# Altium PCB PCB1_Esta_SI.PcbDoc (part 1 of 2)
Units mil, origin at the board's own origin, x right, y up, seen from the top; angles counter-clockwise.
Board outline 3825 x 4015 mil, 4 copper layers (Top Layer, GND, POWER_SIGNAL, Bottom Layer), stack 23.756 mil thick; 87 components, 73 nets, 564 pads, 160 vias.
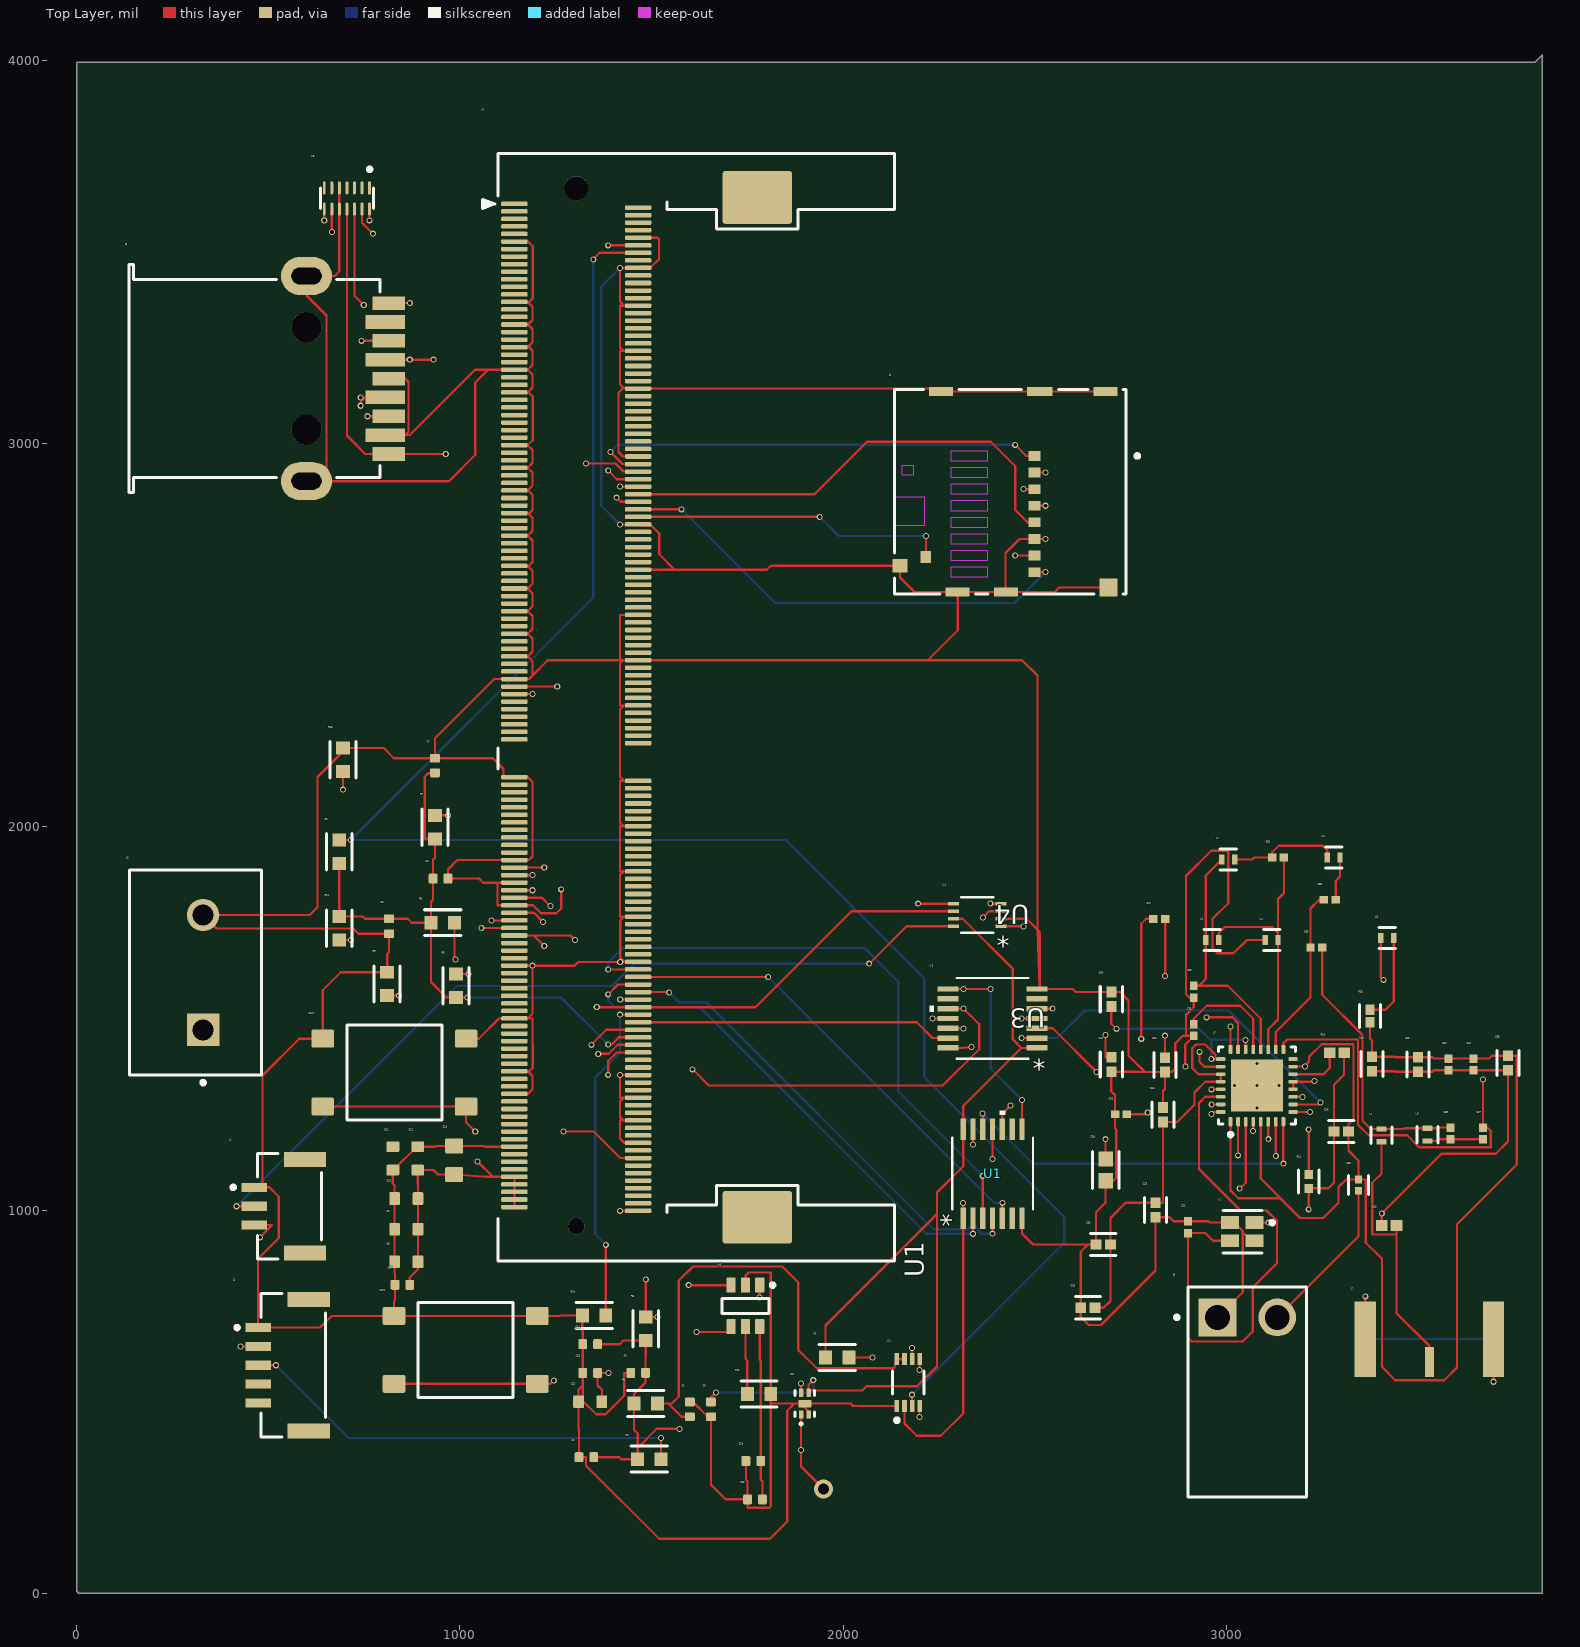
[diagram p0: Top Layer view]
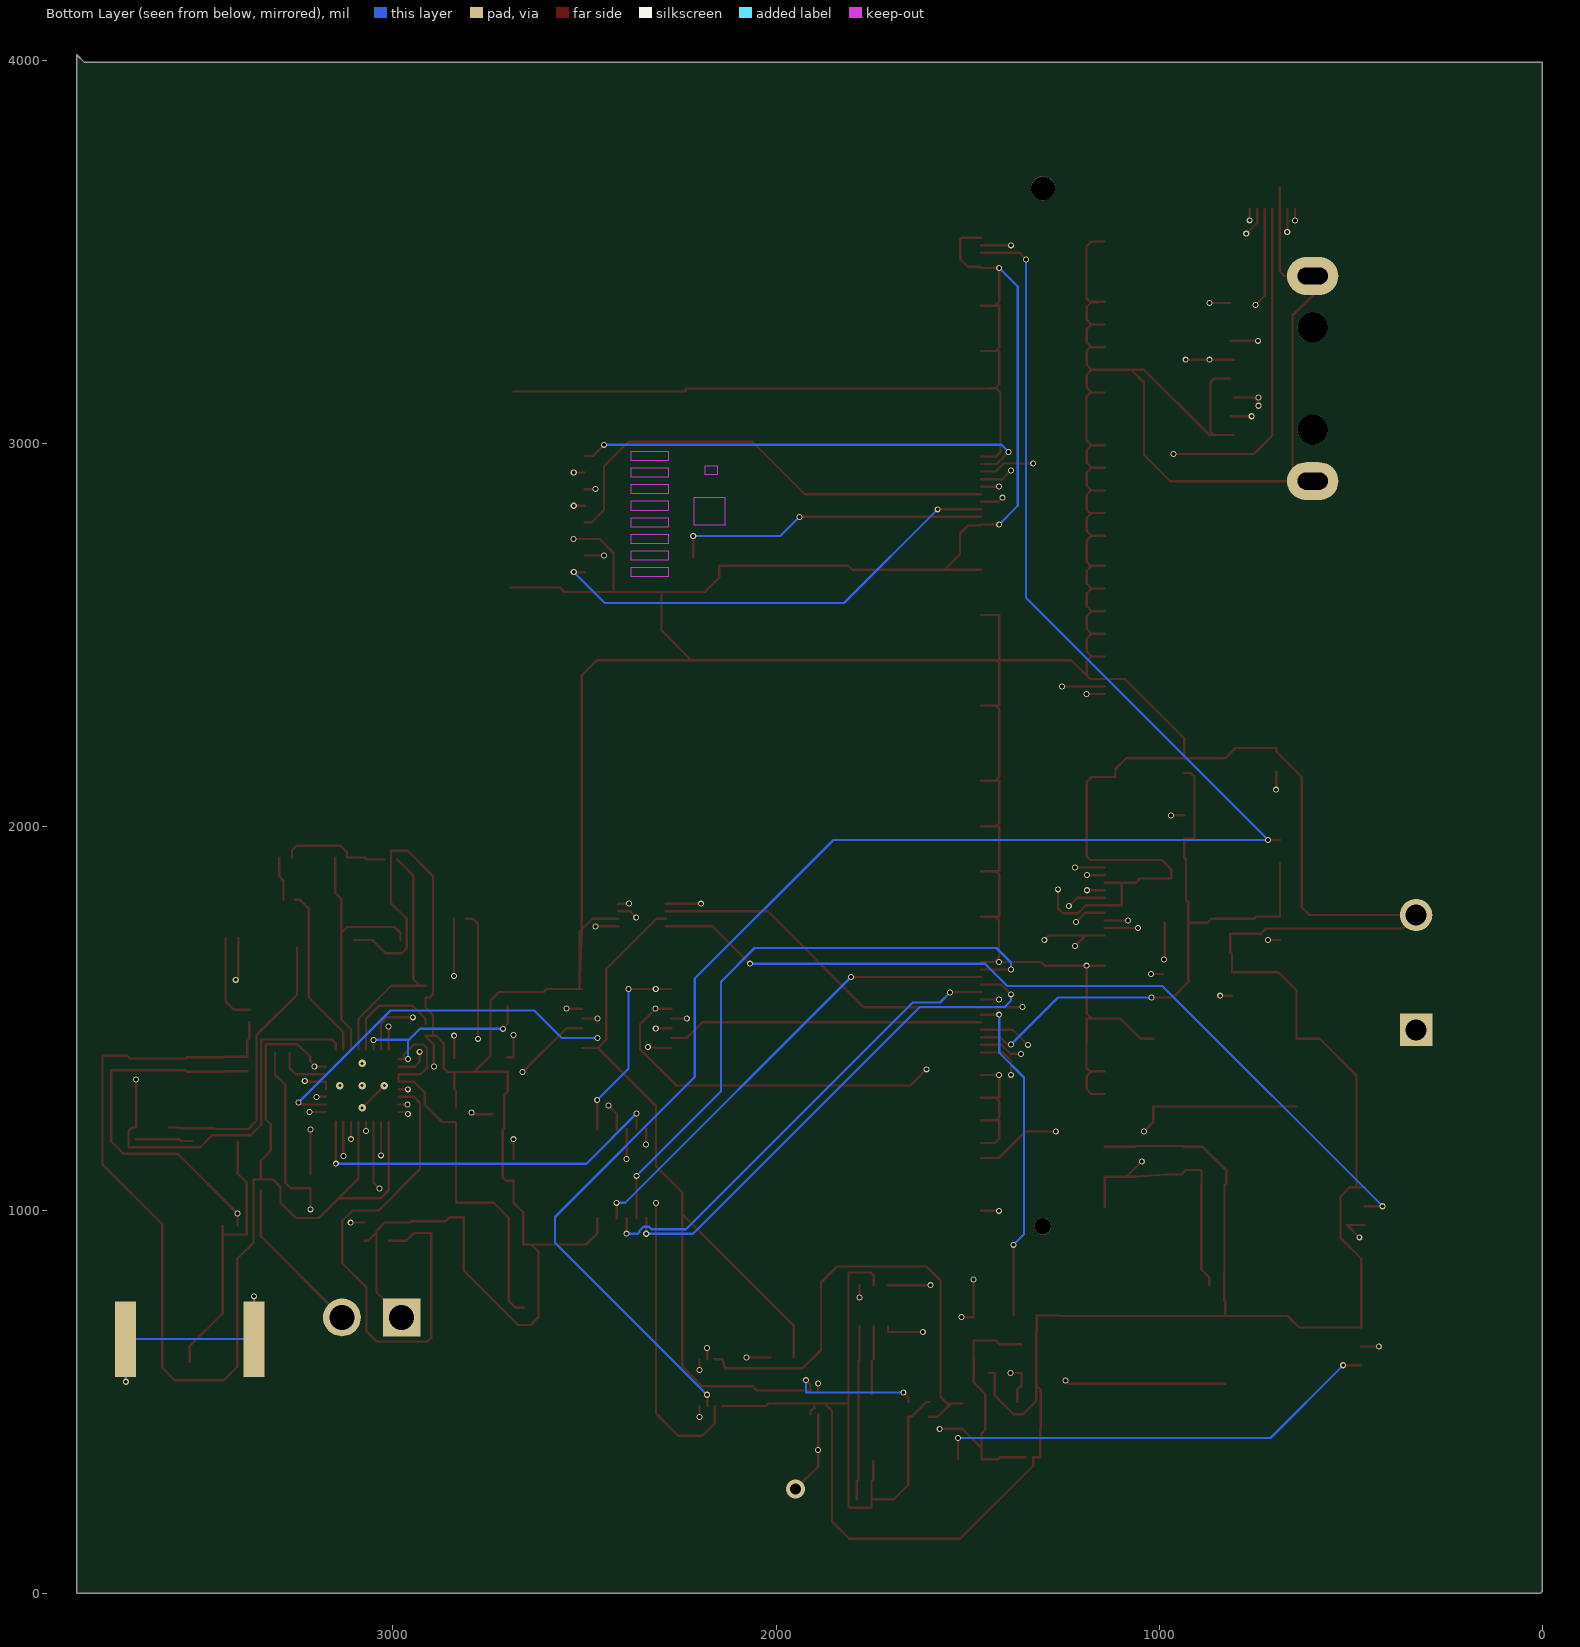
[diagram p1: Bottom Layer view, seen from below]
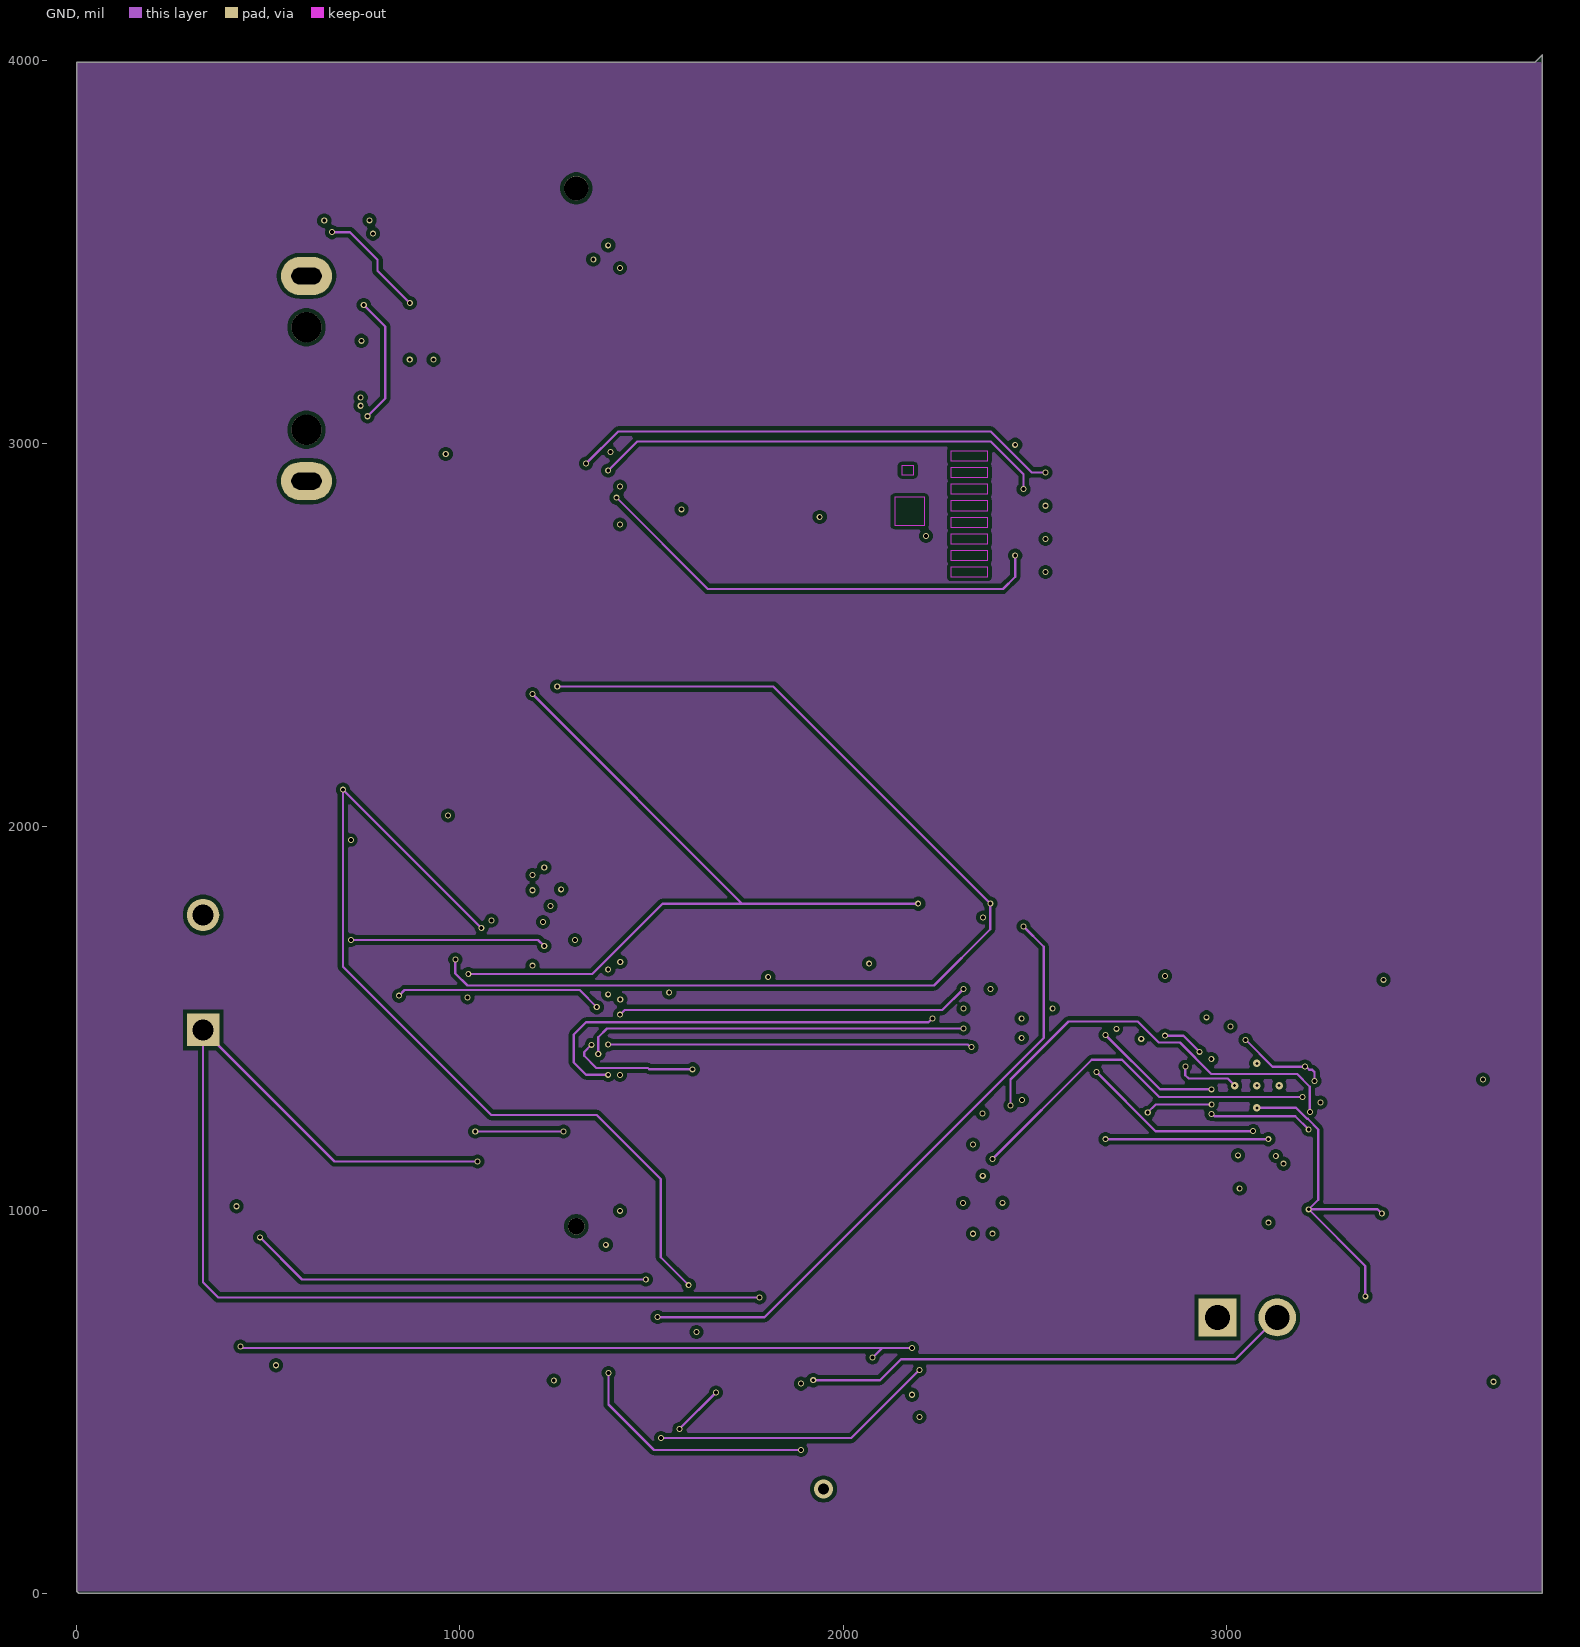
[diagram p2: GND]
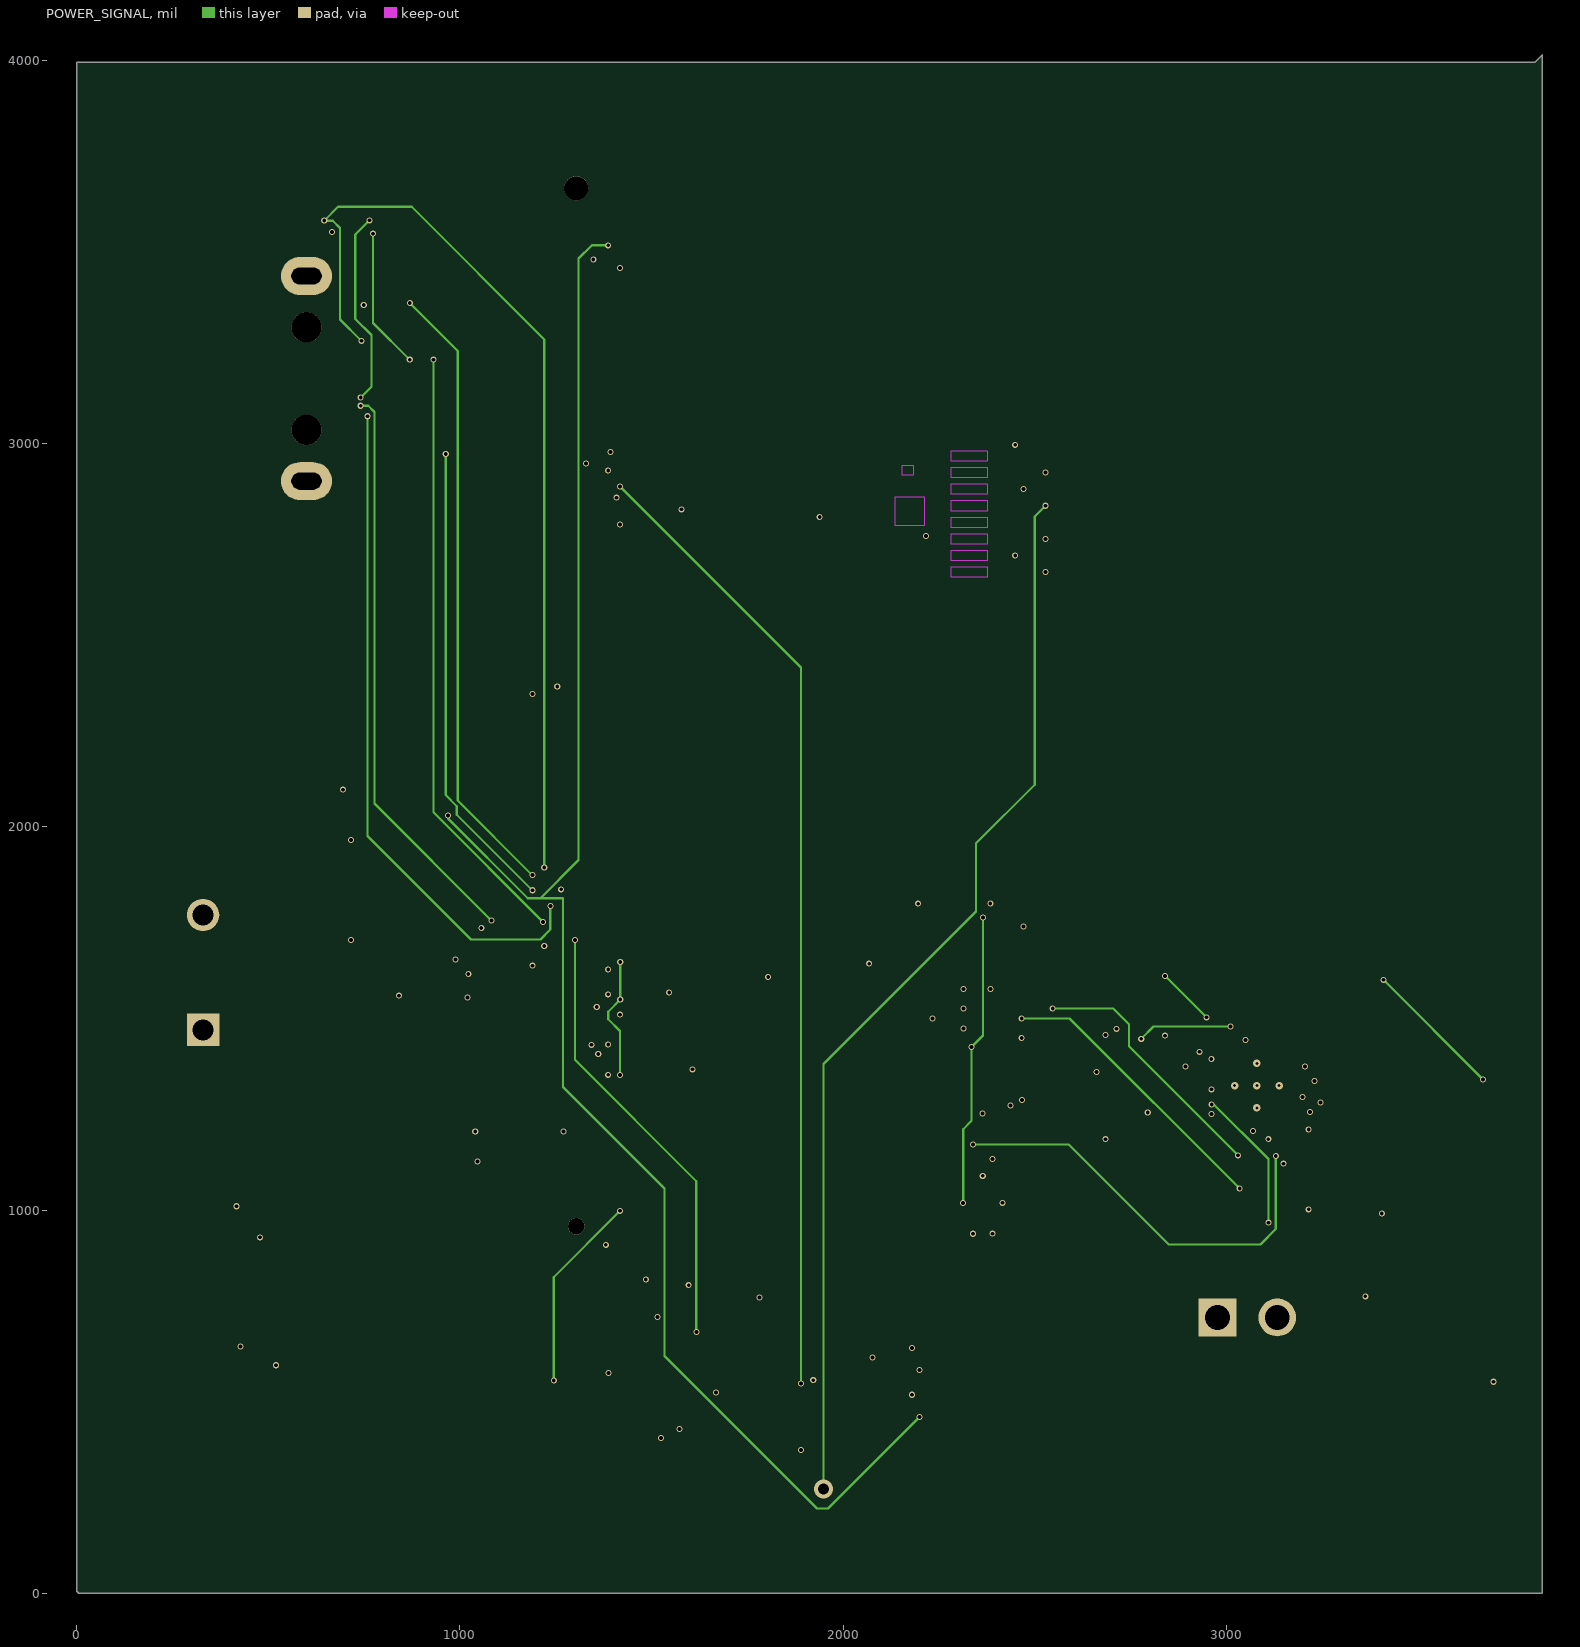
[diagram p3: POWER_SIGNAL]
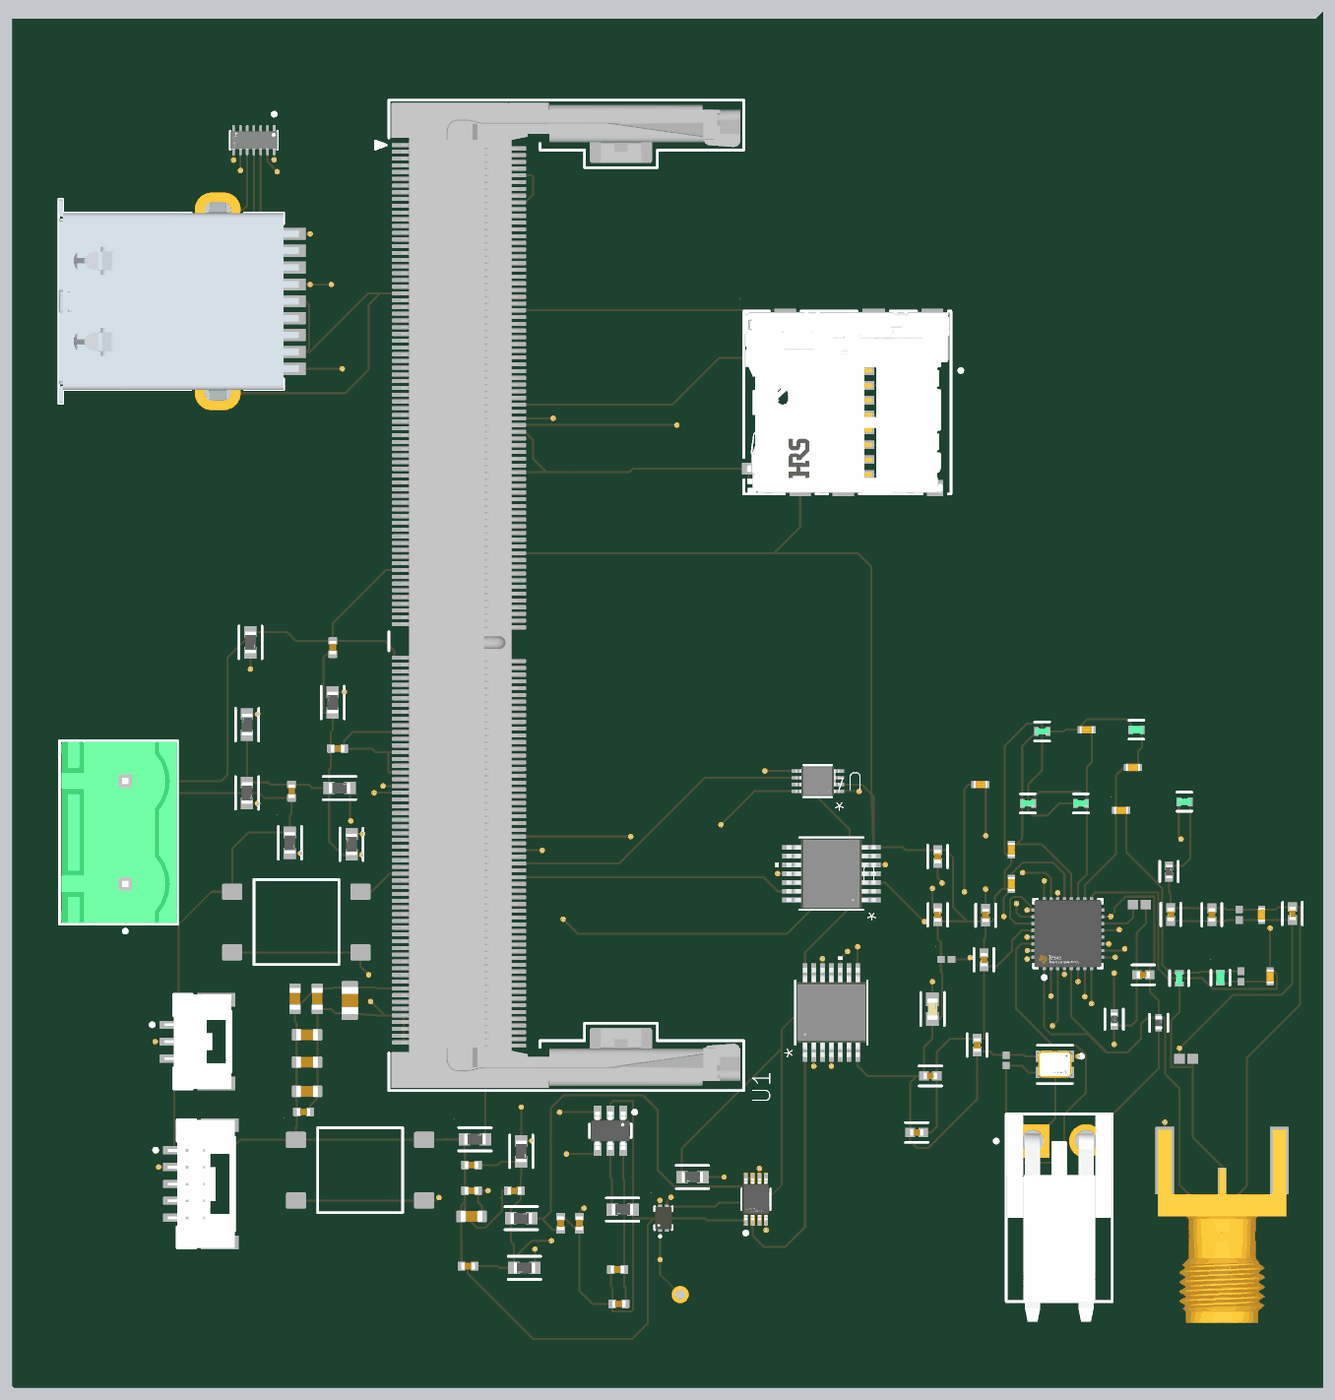
[diagram p5: 3D render of the assembled board from above, using the file's embedded part models]

## Layer stack, top to bottom
Top Solder: solder mask 0.4, Solder Resist, Dk 3.5
Top Layer: signal copper 1.4
Dielectric 2: prepreg 2.8, PP-006, Dk 4.1
GND: signal copper 1.378
Dielectric 1: dielectric 12.6, FR-4, Dk 4.8
POWER_SIGNAL: signal copper 1.378
Dielectric 3: prepreg 2.8, PP-006, Dk 4.1
Bottom Layer: signal copper 1.4
Bottom Solder: solder mask 0.4, Solder Resist, Dk 3.5

## Board outline
3805,3995 3825,4015 3825,0 5,0 0,5 0,3995

## Design rules (kind name [scope] priority, off if disabled: settings)
AssemblyTestPointUsage [All] p1: isadvanced=TRUE
AssemblyTestpoint [All] p1: isadvanced=TRUE testpointundercomponent=TRUE minsize=40 maxsize=100 preferedsize=60 minholesize=0 maxholesize=40 preferedholesize=32 testpointgrid=1 usegrid=TRUE gridtolerance=0.01 allowsidetop=TRUE allowsidebottom=TRUE
Clearance Clearance_1 [(ExistsOnLayer('GND') Or ExistsOnLayer('POWER_SIGNAL')) vs (ExistsOnLayer('GND') Or ExistsOnLayer('POWER_SIGNAL'))] p1: gap=10 ignorepadtopadclearanceinfootprint=FALSE except(5.91: Arc-Arc Arc-Track Arc-SMDPad Arc-Via Arc-Text Track-Track Track-SMDPad Track-Via Track-Text SMDPad-SMDPad SMDPad-Text Via-Via Via-Text Fill-Fill Fill-Poly Fill-Region Poly-Poly Poly-Region Region-Region Text-Text) sourcerule=46 cellrowname=All cellrowtype=0 cellcolname=All cellcoltype=0 innerlayers=TRUE
Clearance Clearance_2 [(ExistsOnLayer('Top Layer') Or ExistsOnLayer('Bottom Layer')) vs (ExistsOnLayer('Top Layer') Or ExistsOnLayer('Bottom Layer'))] p2: gap=10 ignorepadtopadclearanceinfootprint=FALSE except(5.91: Arc-Arc Arc-Track Arc-SMDPad Arc-Via Arc-Text Track-Track Track-SMDPad Track-Via Track-Text SMDPad-SMDPad SMDPad-Text Via-Via Via-Text Fill-Fill Fill-Poly Fill-Region Poly-Poly Poly-Region Region-Region Text-Text) sourcerule=46 cellrowname=All cellrowtype=0 cellcolname=All cellcoltype=0 outerlayers=TRUE
Clearance [All] p3: gap=10 ignorepadtopadclearanceinfootprint=FALSE ismatrix=TRUE
ComponentClearance [All] p1: isadvanced=TRUE gap=10 collisioncheckmode=3 verticalgap=10 showdistances=FALSE
FabricationTestPointUsage [All] p1: isadvanced=TRUE valid=0 allowmultiple=FALSE
FabricationTestpoint [All] p1: isadvanced=TRUE side=3 testpointundercomponent=TRUE minsize=40 maxsize=100 preferedsize=60 minholesize=0 maxholesize=40 preferedholesize=32 testpointgrid=1 allowsidetop=TRUE allowsidebottom=TRUE usegrid=TRUE gridtolerance=0.01
FanoutControl Fanout_BGA [IsBGA] p1: isadvanced=TRUE bgadir=Out bgaviamode=Centered fanoutstyle=Auto fanoutdirection=Alternating viagrid=1 // Fanout_BGA (Default Rule)
FanoutControl Fanout_LCC [IsLCC] p2: isadvanced=TRUE bgadir=Out bgaviamode=Centered fanoutstyle=Auto fanoutdirection=Alternating viagrid=1 // Fanout_LCC (Default Rule)
FanoutControl Fanout_SOIC [IsSOIC] p3: isadvanced=TRUE bgadir=Out bgaviamode=Centered fanoutstyle=Auto fanoutdirection=Alternating viagrid=1 // Fanout_SOIC (Default Rule)
FanoutControl Fanout_Small [(CompPinCount < 5)] p4: isadvanced=TRUE bgadir=Out bgaviamode=Centered fanoutstyle=Auto fanoutdirection=OutThenIn viagrid=1 // Fanout_Small (Default Rule)
FanoutControl Fanout_Default [All] p5: isadvanced=TRUE bgadir=Out bgaviamode=Centered fanoutstyle=Auto fanoutdirection=Alternating viagrid=1 // Fanout_Default (Default Rule)
Height [All] p1: isadvanced=TRUE minheight=0 maxheight=1000 prefheight=500
HoleSize [All] p1: isadvanced=TRUE absolutevalues=TRUE maxlimit=100 minlimit=5 maxpercent=80.000 minpercent=20.000
HoleToHoleClearance [All] p1: isadvanced=TRUE gap=10 allowstackedmicrovias=TRUE
LayerPairs [All] p1: isadvanced=TRUE enforce=TRUE
MinimumSolderMaskSliver [All] p1: isadvanced=TRUE minsoldermaskwidth=3
NetAntennae [All] p1 off: isadvanced=TRUE netantennaetolerance=0
PasteMaskExpansion [All] p1: isadvanced=TRUE expansion=0
PlaneClearance [All] p1: isadvanced=TRUE clearance=20
PlaneConnect [All] p1: isadvanced=TRUE planeconnectstyle=Relief reliefexpansion=20 reliefentries=4 reliefconductorwidth=10 reliefairgap=10
PolygonConnect [All] p1: connectstyle=Relief reliefconductorwidth=10 reliefentries=4 polygonreliefangle="90 Angle" airgapwidth=10
RoutingCorners [All] p1: isadvanced=TRUE cornerstyle=45-Degree minsetback=9.84 maxsetback=100
RoutingLayers RoutingLayers_3 [InNet('GND')] p1 off: isadvanced=TRUE top layer_v5=FALSE mid layer 1_v5=FALSE mid layer 2_v5=FALSE bottom layer_v5=FALSE
RoutingLayers RoutingLayers_2 [InNetClass('PowerNets')] p2 off: isadvanced=TRUE top layer_v5=TRUE mid layer 1_v5=FALSE mid layer 2_v5=TRUE bottom layer_v5=TRUE
RoutingLayers RoutingLayers_1 [All] p3 off: isadvanced=TRUE top layer_v5=TRUE mid layer 1_v5=FALSE mid layer 2_v5=FALSE bottom layer_v5=TRUE
RoutingLayers [All] p4: top layer_v5=TRUE mid layer 1_v5=TRUE mid layer 2_v5=TRUE bottom layer_v5=TRUE
RoutingPriority [All] p1: isadvanced=TRUE routingpriority=0
RoutingVias RoutingViaStyle_3 [All] p1: isadvanced=TRUE holewidth=10 width=15.75 viastyle="Through Hole" minholewidth=10 minwidth=15.75 maxholewidth=10 maxwidth=15.75
RoutingVias RoutingViaStyle_1 [InNet('+1V8_SOM')] p2 off: holewidth=11.81 width=23.62 viastyle="Through Hole" minholewidth=11.81 minwidth=23.62 maxholewidth=11.81 maxwidth=23.62
RoutingVias RoutingViaStyle_2 [InNetClass('Source')] p3 off: holewidth=11.81 width=23.62 viastyle="Through Hole" minholewidth=11.81 minwidth=23.62 maxholewidth=11.81 maxwidth=23.62
RoutingVias [All] p4: holewidth=28 width=50 viastyle="Through Hole" minholewidth=28 minwidth=50 maxholewidth=28 maxwidth=50
ShortCircuit [All] p1: isadvanced=TRUE allowed=FALSE
SilkToSilkClearance [All] p1 off: isadvanced=TRUE silktosilkclearance=5
SilkToSolderMaskClearance [IsPad] p1 off: isadvanced=TRUE minsilkscreentomaskgap=10 clearancetoexposedcopper=TRUE
SolderMaskExpansion [All] p1: isadvanced=TRUE expansion=0 istentingtop=FALSE
SupplyNets "Schematic Supply Nets_2" [InNet('GND')] p1: isadvanced=TRUE voltage=0.000
SupplyNets "Schematic Supply Nets_1" [InNet('VDD_REG')] p2: isadvanced=TRUE voltage=0.000
SupplyNets "Schematic Supply Nets" [InNet('3V3')] p3: isadvanced=TRUE voltage=0.000
UnRoutedNet [All] p1: isadvanced=TRUE
UnpouredPolygon [All] p1: isadvanced=TRUE
Width MaxMinWidth_1 [InNetClass('Source')] p1: maxlimit=19.68 minlimit=7.87 preferedwidth=11.81 minimp=50.000000 maximp=50.000000 favimp=50.000000
Width [All] p2: maxlimit=5.91 minlimit=5.91 preferedwidth=5.91 minimp=50.000000 maximp=50.000000 favimp=50.000000
3 further rules are at their usual default settings.

## Classes and differential pairs
net class PowerNets: 3V3 +1V8_SOM +3V3_SD +5V_CAM_USB +5V_SOM VDD_REG

## Components (designator, comment, footprint, x,y, rotation, side; value= is the part's Value field where it differs from the comment)
C1 "100pF" CAPC1005X60N 1600,480 r270 top
C2 "100nF" CAPC1005X60N 1330,355 r0 top
C3 "100nF" CAPC1005X60N 815,1740.71 r90 top
C4 "100nF" CAPC1005X60N 949.29,1865 r180 top
C5 "100nF" CAPC1005X60N 1465,575 r0 top
C6 "100nF" CAPC1005X60N 1655,480 r90 top
C7 "100nF" CAPC1005X60N 935,2160 r270 top
C8 "4.7uF" T_CAPC0603X33N 860,865 r0 top
C9 "4.7uF" T_CAPC0603X33N 860,950 r0 top
C10 "4.7uF" T_CAPC0603X33N 860,1030 r0 top
C11 "4.7uF" T_CAPC0603X33N 825,1135 r90 top
C12 "4.7uF" T_CAPC0603X33N 890,1135 r270 top
C13 "22uF" T_CAPC0805X125N 985,1130 r270 top
C14 "100nF" CAPC1005X60N 1340,650 r0 top
C15 "10uF" T_CAPC0603X33N 1340,500 r0 top
C16 "100nF" CAPC1005X60N 1340,575 r0 top
C17 "100nF" CAPC1005X60N 850,805 r0 top
C18 "150uF" CAPC1005X60N 1770,245 r0 top
C19 "100nF" CAPC1005X60N 1765.71,345 r0 top
C20 "15 pF" CAPC1005X55X25LL05T10 2725,1250 r180 top
C21 "15 pF" CAPC1005X55X25LL05T10 2900,955.35 r90 top
C22 "47nF" FP-GRM155-0_05-IPC_A 2700,1380 r90 top
C23 "47nF" FP-GRM155-0_05-IPC_A 2815,1000 r90 top
C24 "47nF" FP-GRM155-0_05-IPC_A 2835,1248.84 r270 top
C25 "47nF" FP-GRM155-0_05-IPC_A 2840,1378.84 r90 top
C26 "47nF" FP-GRM155-0_05-IPC_A 3300,1205 r0 top
C27 "1.8nF" CAPC1005X55X25LL05T10 2825,1760 r180 top
C28 "5.1 pF" CAPC1005X55X25LL05T10 2915,1570 r90 top
C29 "47nF" FP-GRM155-0_05-IPC_A 2638.84,745 r0 top
C30 "47nF" FP-GRM155-0_05-IPC_A 2700,1550 r90 top
C31 "10 nF" CAPC1005X55X25LL05T10 2915,1470 r270 top
C32 "47nF" FP-GRM155-0_05-IPC_A 2678.84,910 r0 top
C33 "5.1 pF" CAPC1005X55X25LL05T10 3135,1920 r0 top
C34 "0.22 μF" FP-C0603C-CF-IPC_B 2685,1105 r270 top
C35 "5.1 pF" CAPC1005X55X25LL05T10 3270,1810 r180 top
C36 "5.1 pF" CAPC1005X55X25LL05T10 3235,1685 r0 top
C37 "39 pF" CAPC1005X55X25LL05T10 3670,1200 r270 top
C38 "47nF" FP-GRM155-0_05-IPC_A 3735,1383.84 r270 top
C39 "2.2 pF" CAPC1005X55X25LL05T10 3585,1200 r90 top
C40 "6.2 pF" CAPC1005X60X25ML10T15 3425,960 r0 top
C41 "10 nF" CAPC1005X55X25LL05T10 3645,1380 r90 top
C42 "100 pF" CAPC1005X55X25LL05T10 3580,1380 r270 top
C43 "47nF" FP-GRM155-0_05-IPC_A 3500,1380 r270 top
C44 "47nF" FP-GRM155-0_05-IPC_A 3380,1381.16 r270 top
FB1 "L_BEAD_102_0402" FP-BLM15-0_05-IPC_C 3345,1065.1 r90 top
IC1 "MIC94073YMT" T_TDFN0P120X160X60-4N 1900,495 r0 top
J1 "" FP-BM05B-GHS-TBT_LF_SN-MFG 565,595 r90 top
J2 "BM03B-GHS-TBT (LF)(SN)(N)" FP-BM03B-GHS-TBT_LF_SN-MFG 555,1010 r90 top
J3 "1766563" FP-1766563-MFG 310,1620 r90 top
J4 "DM3NW-SF-PEJ(800)" FP-DM3NW-SF-PEJ_800-MFG 2350,2840 r90 top
J5 "692122030100" 692122030100 463.74,3170 r270 top
J6 "S2P-VH(LF)(SN)" FP-S2P-VH_LF_SN-MFG 3055,525 r0 top
J7 "Coaxial" 60312202114512 3530,345 r0 top
L1 "27 nH" FP-LQW15AN_00-W0_5-0_1-MFG 3005,1915 r0 top
L2 "56 nH" FP-LQW15AN_00-W0_5-0_1-MFG 2963.27,1705 r0 top
L3 "15nH" FP-LQW15AN_00-W0_6-0_1-MFG 3280,1920 r0 top
L4 "27 nH" FP-LQW15AN_00-W0_5-0_1-MFG 3118.27,1705 r0 top
L5 "56 nH" FP-LQW15AN_00-W0_5-0_1-MFG 3420,1710 r180 top
L6 "15nH" FP-LQW15AN_00-W0_6-0_1-MFG 3525,1196.73 r90 top
L7 "43 nF" FP-LQW15AN_00-W0_5-0_1-MFG 3405,1195 r270 top
R1 "RC0603FR-074K7L" FP-RC0603-0_55-IPC_B 1984.42,615 r180 top
R2 "RC0603FR-074K7L" FP-RC0603-0_55-IPC_B 1494.42,350 r180 top
R3 "RC0603FR-074K7L" FP-RC0603-0_55-IPC_B 685,1935 r90 top
R4 "RC0603FR-07200KL" FP-RC0603-0_55-IPC_B 1485,495 r0 top
R5 "RC0603FR-0747KL" FP-RC0603-0_55-IPC_B 955,1750 r0 top
R6 "RC0603FR-0710KL" FP-RC0603-0_55-IPC_B 990,1585.58 r90 top
R7 "RC0603FR-074K7L" FP-RC0603-0_55-IPC_B 935,1999.42 r90 top
R8 "RC0603FR-0710KL" FP-RC0603-0_55-IPC_B 1485,690 r270 top
R9 "RC0603FR-0710KL" FP-RC0603-0_55-IPC_B 810,1590 r270 top
R10 "RC0603FR-0710KL" FP-RC0603-0_55-IPC_B 1350,725 r0 top
R11 "RC0603FR-0710kL" FP-RC0603-0_55-IPC_B 685,1735.58 r270 top
R12 "RC0603FR-0710KL" FP-RC0603-0_55-IPC_B 1780.58,520 r180 top
R13 "RC0603FR-0710kL" FP-RC0603-0_55-IPC_B 695,2175 r270 top
R14 "0mR" FP-RK73Z1E-IPC_B 3215,1075 r90 top
R15 "18R" FP-RMCF0402-IPC_B 3375,1506.36 r90 top
R16 "56 Kohm" RESC1005X40X25ML10T10 3288.7,1410 r180 top
SW1 "TD-03XB" T_WMF_TD-03XB 829.02,1358.71 r0 top
SW2 "TD-03XB" T_WMF_TD-03XB 1015,635 r0 top
U1 "TXU0304PWR" TSSOP14_PW_TEX 2390,1095 r90 top
U2 "PCA9306DCUR" FP-DCU0008A-MFG 2170,550 r90 top
U3 "TXU0304PWR" TSSOP14_PW_TEX 2390,1500 r180 top
U4 "TXU0202DCUR" SO8_DCU_TEX 2350,1770 r180 top
U5 "TPD6E05U06RVZR" FP-RVZ0014A-IPC_A 705,3640 r270 top
U6 "" DBV0006A_N 1745,750 r270 top
U7 "" FP-RHB0032E-MFG 3080,1325 r90 top
X1 "2309409-2" CON-TE-2309409-2 1459.09,2312.01 r90 top
Y1 "Crystal_32Mhz" FP-ABM10W-MFG 3041.99,943.62 r180 top

## Footprints (in the part's own frame and the unit in brackets; to place one, negate y for a bottom-side part, rotate by r counter-clockwise, add the part's x,y. Pads: shape width x height; smd on the part's side, far side on the other; paste and mask are expansions set on the pad)
692122030100 [mm] "USB 3.0 Type A Horizontal SMD"
  rect 0.9x2.6 smd: 1(-3.75,8.67) 2(-1.25,8.67) 3(1.25,8.67) 4(3.75,8.67)
  rect 0.9x2.15 smd: 5(5,8.895) 6(2.5,8.895) 7(0,8.895) 8(-2.5,8.895) 9(-5,8.895)
  round 2 hole 2 unplated: MH1(-3.4,3.45) MH2(3.4,3.45)
  oval 2.52x3.4 hole 1.12 slot 2 at 90 deg: Shell(-6.8,3.45) Shell(6.8,3.45)
  silkscreen extent -7.55,-8.33 7.55,8.33, body extent -7.55,-8.33 7.55,9.47, height 7.95
60312202114512 [mm] "SMA PCB End Launch Jack Flat  Tab for 1.1mm PCB"
  rect 0.61x1.97 smd: 1(0,6.57)
  rect 1.4x5 smd: 2(-4.25,8.085) 3(4.25,8.085)
  rect 1.4x5 smd far side: 4(-4.25,8.085) 5(4.25,8.085)
  body extent -4.76,-3.95 4.76,10.34, height 4.11
CAPC1005X55X25LL05T10 [mm] "Chip Capacitor, 2-Leads, Body 1.00x0.50mm, IPC High Density"
  rect 0.56x0.52 smd: 1(-0.39,0) 2(0.39,0)
  body extent -0.53,-0.28 0.53,0.28, height 0.55
CAPC1005X60N [mm]
  rrect30% 0.58x0.66 smd: 1(-0.49,0) 2(0.49,0)
  body extent -0.5,-0.25 0.5,0.25, height 0.6
CAPC1005X60X25ML10T15 [mm] "Chip Capacitor, 2-Leads, Body 1.00x0.50mm, IPC Low Density"
  rect 0.78x0.74 smd: 1(-0.49,0) 2(0.49,0)
  body extent -0.55,-0.3 0.55,0.3, height 0.6
CON-TE-2309409-2 [mm]
  rrect50% 0.3x1.75 smd: 1(33.375,8.05) 2(33.125,-0.15) 3(32.875,8.05) 4(32.625,-0.15) 5(32.375,8.05) 6(32.125,-0.15) 7(31.875,8.05) 8(31.625,-0.15) 9(31.375,8.05) 10(31.125,-0.15) 11(30.875,8.05) 12(30.625,-0.15) 13(30.375,8.05) 14(30.125,-0.15) 15(29.875,8.05) 16(29.625,-0.15) 17(29.375,8.05) 18(29.125,-0.15) 19(28.875,8.05) 20(28.625,-0.15) 21(28.375,8.05) 22(28.125,-0.15) 23(27.875,8.05) 24(27.625,-0.15) 25(27.375,8.05) 26(27.125,-0.15) 27(26.875,8.05) 28(26.625,-0.15) 29(26.375,8.05) 30(26.125,-0.15) 31(25.875,8.05) 32(25.625,-0.15) 33(25.375,8.05) 34(25.125,-0.15) 35(24.875,8.05) 36(24.625,-0.15) 37(24.375,8.05) 38(24.125,-0.15) 39(23.875,8.05) 40(23.625,-0.15) 41(23.375,8.05) 42(23.125,-0.15) 43(22.875,8.05) 44(22.625,-0.15) 45(22.375,8.05) 46(22.125,-0.15) 47(21.875,8.05) 48(21.625,-0.15) 49(21.375,8.05) 50(21.125,-0.15) 51(20.875,8.05) 52(20.625,-0.15) 53(20.375,8.05) 54(20.125,-0.15) 55(19.875,8.05) 56(19.625,-0.15) 57(19.375,8.05) 58(19.125,-0.15) 59(18.875,8.05) 60(18.625,-0.15) 61(18.375,8.05) 62(18.125,-0.15) 63(17.875,8.05) 64(17.625,-0.15) 65(17.375,8.05) 66(17.125,-0.15) 67(16.875,8.05) 68(16.625,-0.15) 69(16.375,8.05) 70(16.125,-0.15) 71(15.875,8.05) 72(15.625,-0.15) 73(15.375,8.05) 74(15.125,-0.15) 75(14.875,8.05) 76(14.625,-0.15) 77(14.375,8.05) 78(14.125,-0.15) 79(13.875,8.05) 80(13.625,-0.15) 81(13.375,8.05) 82(13.125,-0.15) 83(12.875,8.05) 84(12.625,-0.15) 85(12.375,8.05) 86(12.125,-0.15) 87(11.875,8.05) 88(11.625,-0.15) 89(11.375,8.05) 90(11.125,-0.15) 91(10.875,8.05) 92(10.625,-0.15) 93(10.375,8.05) 94(10.125,-0.15) 95(9.875,8.05) 96(9.625,-0.15) 97(9.375,8.05) 98(9.125,-0.15) 99(8.875,8.05) 100(8.625,-0.15) 101(8.375,8.05) 102(8.125,-0.15) 103(7.875,8.05) 104(7.625,-0.15) 105(7.375,8.05) 106(7.125,-0.15) 107(6.875,8.05) 108(6.625,-0.15) 109(6.375,8.05) 110(6.125,-0.15) 111(5.875,8.05) 112(5.625,-0.15) 113(5.375,8.05) 114(5.125,-0.15) 115(4.875,8.05) 116(4.625,-0.15) 117(4.375,8.05) 118(4.125,-0.15) 119(3.875,8.05) 120(3.625,-0.15) 121(3.375,8.05) 122(3.125,-0.15) 123(2.875,8.05) 124(2.625,-0.15) 125(2.375,8.05) 126(2.125,-0.15) 127(1.875,8.05) 128(1.625,-0.15) 129(1.375,8.05) 130(1.125,-0.15) 131(0.875,8.05) 132(0.625,-0.15) 133(0.375,8.05) 134(0.125,-0.15) 135(-0.125,8.05) 136(-0.375,-0.15) 137(-0.625,8.05) 138(-0.875,-0.15) 139(-1.125,8.05) 140(-1.375,-0.15) 141(-1.625,8.05) 142(-1.875,-0.15) 143(-2.125,8.05) 144(-2.375,-0.15) 145(-4.625,8.05) 146(-4.875,-0.15) 147(-5.125,8.05) 148(-5.375,-0.15) 149(-5.625,8.05) 150(-5.875,-0.15) 151(-6.125,8.05) 152(-6.375,-0.15) 153(-6.625,8.05) 154(-6.875,-0.15) 155(-7.125,8.05) 156(-7.375,-0.15) 157(-7.625,8.05) 158(-7.875,-0.15) 159(-8.125,8.05) 160(-8.375,-0.15) 161(-8.625,8.05) 162(-8.875,-0.15) 163(-9.125,8.05) 164(-9.375,-0.15) 165(-9.625,8.05) 166(-9.875,-0.15) 167(-10.125,8.05) 168(-10.375,-0.15) 169(-10.625,8.05) 170(-10.875,-0.15) 171(-11.125,8.05) 172(-11.375,-0.15) 173(-11.625,8.05) 174(-11.875,-0.15) 175(-12.125,8.05) 176(-12.375,-0.15) 177(-12.625,8.05) 178(-12.875,-0.15) 179(-13.125,8.05) 180(-13.375,-0.15) 181(-13.625,8.05) 182(-13.875,-0.15) 183(-14.125,8.05) 184(-14.375,-0.15) 185(-14.625,8.05) 186(-14.875,-0.15) 187(-15.125,8.05) 188(-15.375,-0.15) 189(-15.625,8.05) 190(-15.875,-0.15) 191(-16.125,8.05) 192(-16.375,-0.15) 193(-16.625,8.05) 194(-16.875,-0.15) 195(-17.125,8.05) 196(-17.375,-0.15) 197(-17.625,8.05) 198(-17.875,-0.15) 199(-18.125,8.05) 200(-18.375,-0.15) 201(-18.625,8.05) 202(-18.875,-0.15) 203(-19.125,8.05) 204(-19.375,-0.15) 205(-19.625,8.05) 206(-19.875,-0.15) 207(-20.125,8.05) 208(-20.375,-0.15) 209(-20.625,8.05) 210(-20.875,-0.15) 211(-21.125,8.05) 212(-21.375,-0.15) 213(-21.625,8.05) 214(-21.875,-0.15) 215(-22.125,8.05) 216(-22.375,-0.15) 217(-22.625,8.05) 218(-22.875,-0.15) 219(-23.125,8.05) 220(-23.375,-0.15) 221(-23.625,8.05) 222(-23.875,-0.15) 223(-24.125,8.05) 224(-24.375,-0.15) 225(-24.625,8.05) 226(-24.875,-0.15) 227(-25.125,8.05) 228(-25.375,-0.15) 229(-25.625,8.05) 230(-25.875,-0.15) 231(-26.125,8.05) 232(-26.375,-0.15) 233(-26.625,8.05) 234(-26.875,-0.15) 235(-27.125,8.05) 236(-27.375,-0.15) 237(-27.625,8.05) 238(-27.875,-0.15) 239(-28.125,8.05) 240(-28.375,-0.15) 241(-28.625,8.05) 242(-28.875,-0.15) 243(-29.125,8.05) 244(-29.375,-0.15) 245(-29.625,8.05) 246(-29.875,-0.15) 247(-30.125,8.05) 248(-30.375,-0.15) 249(-30.625,8.05) 250(-30.875,-0.15) 251(-31.125,8.05) 252(-31.375,-0.15) 253(-31.625,8.05) 254(-31.875,-0.15) 255(-32.125,8.05) 256(-32.375,-0.15) 257(-32.625,8.05) 258(-32.875,-0.15) 259(-33.125,8.05) 260(-33.375,-0.15)
  round 1.1 hole 1.1 unplated: ""(-34.4,3.95)
  rrect10% 3.5x4.6 smd: ""(-33.8,-8.05) ""(33.8,-8.05)
  round 1.6 hole 1.6 unplated: ""(34.4,3.95)
  silkscreen extent -36.7,-17.15 36.7,10.15, body extent -36.5,-16.9 36.5,8.95, height 5.27
DBV0006A_N [mm] "SOT23, 6-Leads, Body 3.05x1.75mm, Pitch 0.95mm, IPC Medium Density"
  rrect17% 1x0.6 smd: 1(-1.375,0.95) 2(-1.375,0) 3(-1.375,-0.95) 4(1.375,-0.95) 5(1.375,0) 6(1.375,0.95)
  silkscreen extent -1.5,-1.55 0.5,1.93, body extent -1.42,-1.46 1.42,1.46, height 1.11
FP-1766563-MFG [mm]
  rect 2.15x2.15 hole 1.4 paste-2539.97 mask+0: 1(-3.81,-0.5)
  round 2.15 hole 1.4 paste-2539.97 mask+0: 2(3.81,-0.5)
  silkscreen extent -7.42,-4.37 6.8,4.37, body extent -6.9,-4.47 6.9,4.47, height 0.25
FP-ABM10W-MFG [mm]
  rect 1.2x0.85 smd paste+0 mask+0: 1(-0.812,-0.6) 2(0.812,-0.6) 3(0.812,0.6) 4(-0.812,0.6)
  silkscreen extent -2.1,-1.41 1.3,1.42, body extent -1.51,-1.15 1.51,1.15, height 0.25
FP-BLM15-0_05-IPC_C [mil]
  rect 20.29x18.6 smd paste+0 mask+0: 1(-14.9,0) 2(14.9,0)
  silkscreen extent -25,-27 25,27, body extent -29,-15 29,15, height 10
FP-BM03B-GHS-TBT_LF_SN-MFG [mm]
  rect 0.6x1.7 smd paste+0 mask+0: 1(1.25,2.325) 2(0,2.325) 3(-1.25,2.325)
  rect 1x2.8 smd paste+0 mask+0: 4(-3.1,-1.025) 5(3.1,-1.025)
  silkscreen extent -3.5,-2.13 3.5,3.85, body extent -3.7,-2.52 3.7,3.27, height 0.25
FP-BM05B-GHS-TBT_LF_SN-MFG [mm]
  rect 0.6x1.7 smd paste+0 mask+0: 1(2.5,2.325) 2(1.25,2.325) 3(0,2.325) 4(-1.25,2.325) 5(-2.5,2.325)
  rect 1x2.8 smd paste+0 mask+0: 6(-4.35,-1.025) 7(4.35,-1.025)
  silkscreen extent -4.75,-2.13 4.75,3.85, body extent -4.95,-2.52 4.95,3.27, height 0.25
FP-C0603C-CF-IPC_B [mil]
  rect 39.63x37.73 smd paste+0 mask+0: 1(-28.58,0) 2(28.58,0)
  silkscreen extent -48,-35 48,35, body extent -58,-29 58,29, height 10
FP-DCU0008A-MFG [mm]
  rect 0.8x0.3 smd paste-1000 mask+0: 1(-1.55,0.75) 2(-1.55,0.25) 3(-1.55,-0.25) 4(-1.55,-0.75) 5(1.55,-0.75) 6(1.55,-0.25) 7(1.55,0.25) 8(1.55,0.75)
  silkscreen extent -2.62,-1.05 0.78,1.05, body extent -2.05,-1.3 2.05,1.3, height 0.25
FP-DM3NW-SF-PEJ_800-MFG [mm]
  rect 0.9x1 smd paste+0 mask+0: 1(-4.02,5.12)
  rect 0.8x0.7 smd paste+0 mask+0: 2(-3.44,3.4)
  rect 0.6x1.6 smd paste+0 mask+0: 3(7.53,2.4) 4(-5.77,1.3) 5(-5.77,-1.9) 8(7.53,-8.5)
  rect 0.6x1.7 smd paste+0 mask+0: 6(7.53,-4.15)
  rect 1.2x1.2 smd paste+0 mask+0: 7(-5.47,-8.7)
  rect 0.64x0.8 smd paste+0 mask+0: C1(3.25,-3.8) C2(2.15,-3.8) C3(1.05,-3.8) C4(-0.05,-3.8) C5(-1.15,-3.8) C6(-2.25,-3.8) C7(-3.35,-3.8) C8(-4.45,-3.8)
  Keep-Out Layer region: 2.01,4.2 2.61,4.2 2.61,5 2.01,5
  Keep-Out Layer region: -1.35,3.48 0.51,3.48 0.51,5.48 -1.35,5.48
  Keep-Out Layer region: 2.93,-0.705 3.57,-0.705 3.57,1.745 2.93,1.745
  Keep-Out Layer region: 1.83,-0.705 2.47,-0.705 2.47,1.745 1.83,1.745
  Keep-Out Layer region: 0.73,-0.705 1.37,-0.705 1.37,1.745 0.73,1.745
  Keep-Out Layer region: -0.37,-0.705 0.27,-0.705 0.27,1.745 -0.37,1.745
  Keep-Out Layer region: -1.47,-0.705 -0.83,-0.705 -0.83,1.745 -1.47,1.745
  Keep-Out Layer region: -2.57,-0.705 -1.93,-0.705 -1.93,1.745 -2.57,1.745
  Keep-Out Layer region: -3.67,-0.705 -3.03,-0.705 -3.03,1.745 -3.67,1.745
  Keep-Out Layer region: -4.77,-0.705 -4.13,-0.705 -4.13,1.745 -4.77,1.745
  silkscreen extent -5.9,-10.73 7.66,5.47, body extent -6.17,-9.97 7.93,5.72, height 0.25
FP-GRM155-0_05-IPC_A [mil]
  rect 28.16x26.48 smd paste+0 mask+0: 1(-18.84,0) 2(18.84,0)
  silkscreen extent -33,-29 33,29, body extent -41,-21 41,21, height 10
FP-LQW15AN_00-W0_5-0_1-MFG [mm]
  rect 0.35x0.65 smd paste+0 mask+0: 1(-0.425,0) 2(0.425,0)
  silkscreen extent -0.55,-0.71 0.55,0.7, body extent -0.7,-0.43 0.7,0.43, height 0.25
FP-LQW15AN_00-W0_6-0_1-MFG [mm]
  rect 0.35x0.65 smd paste+0 mask+0: 1(-0.425,0) 2(0.425,0)
  silkscreen extent -0.55,-0.7 0.55,0.7, body extent -0.7,-0.45 0.7,0.45, height 0.25
FP-RC0603-0_55-IPC_B [mil]
  rect 33.81x35.91 smd paste+0 mask+0: 1(-30.58,0) 2(30.58,0)
  silkscreen extent -47,-34 47,34, body extent -57,-28 57,28, height 10
FP-RHB0032E-MFG [mm]
  rrect40% 0.6x0.25 smd paste+0 mask+0: 1(-2.4,1.75) 2(-2.4,1.25) 3(-2.4,0.75) 4(-2.4,0.25) 5(-2.4,-0.25) 6(-2.4,-0.75) 7(-2.4,-1.25) 8(-2.4,-1.75) 17(2.4,-1.75) 18(2.4,-1.25) 19(2.4,-0.75) 20(2.4,-0.25) 21(2.4,0.25) 22(2.4,0.75) 23(2.4,1.25) 24(2.4,1.75)
  rrect40% 0.25x0.6 smd paste+0 mask+0: 9(-1.75,-2.4) 10(-1.25,-2.4) 11(-0.75,-2.4) 12(-0.25,-2.4) 13(0.25,-2.4) 14(0.75,-2.4) 15(1.25,-2.4) 16(1.75,-2.4) 25(1.75,2.4) 26(1.25,2.4) 27(0.75,2.4) 28(0.25,2.4) 29(-0.25,2.4) 30(-0.75,2.4) 31(-1.25,2.4) 32(-1.75,2.4)
  rrect3% 3.45x3.45 smd paste-1000 mask+0: 33(0,0)
  silkscreen extent -3.37,-2.55 2.55,2.55, body extent -2.8,-2.8 2.8,2.8, height 0.25
FP-RK73Z1E-IPC_B [mil]
  rect 23.14x22.54 smd paste+0 mask+0: 1(-18.27,0) 2(18.27,0)
  silkscreen extent -30,-27 30,27, body extent -36,-17 36,17, height 10
FP-RMCF0402-IPC_B [mil]
  rect 26.81x22.54 smd paste+0 mask+0: 1(-16.36,0) 2(16.36,0)
  silkscreen extent -30,-27 30,27, body extent -36,-17 36,17, height 10
FP-RVZ0014A-IPC_A [mm]
  rect 0.861x0.192 smd paste+0 mask+0: 1(-0.701,1.5)
  rrect100% 0.861x0.192 smd paste+0 mask+0: 2(-0.701,1) 3(-0.701,0.5) 4(-0.701,0) 5(-0.701,-0.5) 6(-0.701,-1) 7(-0.701,-1.5) 8(0.701,-1.5) 9(0.701,-1) 10(0.701,-0.5) 11(0.701,0) 12(0.701,0.5) 13(0.701,1) 14(0.701,1.5)
  silkscreen extent -2.06,-1.75 0.67,1.75, body extent -1.63,-2.25 1.63,2.25, height 0.25
FP-S2P-VH_LF_SN-MFG [mm]
  rect 2.5x2.5 hole 1.65 paste-2539.97 mask+0: 1(-1.98,4.95)
  round 2.5 hole 1.65 paste-2539.97 mask+0: 2(1.98,4.95)
  silkscreen extent -4.8,-6.95 3.93,6.95, body extent -4.03,-8.55 4.03,7.05, height 0.25
RESC1005X40X25ML10T10 [mm] "Chip Resistor, 2-Leads, Body 1.00x0.50mm, IPC Low Density"
  rect 0.75x0.7 smd: 1(-0.475,0) 2(0.475,0)
  body extent -0.55,-0.3 0.55,0.3, height 0.4
SO8_DCU_TEX [mil]
  rect 29.78x10 smd paste+0 mask+0: 1(-61.89,29.53) 2(-61.89,9.84) 3(-61.89,-9.85) 4(-61.89,-29.54) 5(61.89,-29.54) 6(61.89,-9.85) 7(61.89,9.84) 8(61.89,29.53)
  silkscreen extent -42,-47 42,47, body extent -63,-41 63,41, height 35
T_CAPC0603X33N [mm]
  rrect20% 0.7x0.85 smd: 1(-0.775,0) 2(0.775,0)
  body extent -0.8,-0.4 0.8,0.4, height 0.9
T_CAPC0805X125N [mm]
  rrect20% 1x1.2 smd: 1(-0.95,0) 2(0.95,0)
  body extent -1,-0.62 1,0.63, height 1
T_TDFN0P120X160X60-4N [mm]
  rrect30% 0.3x0.55 smd: 1(-0.25,-0.725) 2(0.25,-0.725) 3(0.25,0.725) 4(-0.25,0.725)
  rrect20% 0.86x0.5 smd paste-0.05: 5(0,0)
  silkscreen extent -0.65,-1.42 0.65,0.85, body extent -0.63,-0.83 0.62,0.83, height 0.6
T_WMF_TD-03XB [mm]
  rrect20% 1.5x1.2 smd: 1(4.75,2.25) 2(-4.75,2.25) 3(4.75,-2.25) 4(-4.75,-2.25)
  silkscreen extent -3.15,-3.15 3.15,3.15, body extent -5.15,-3 5.15,3, height 7.8
TSSOP14_PW_TEX [mm]
  rect 1.404x0.355 smd paste+0 mask+0: 1(-2.95,1.95) 2(-2.95,1.3) 3(-2.95,0.65) 4(-2.95,0) 5(-2.95,-0.65) 6(-2.95,-1.3) 7(-2.95,-1.95) 8(2.95,-1.95) 9(2.95,-1.3) 10(2.95,-0.65) 11(2.95,0) 12(2.95,0.65) 13(2.95,1.3) 14(2.95,1.95)
  silkscreen extent -2.37,-2.68 4.16,2.68, body extent -3.3,-2.55 3.3,2.55, height 1.2

## Part data
C1 C2 C3 C4 C5 C6 C7 C14 C16 C17 C18 C19: library part C-X7R-100nF-16V-10%-0402, "Capacitor Ceramic X7R 100nF 16V 10% 0402", Rating=16V, Tolerance=10%, Type=X7R
C8 C9 C10 C11 C12: library part C-X5R-4.7uF-10V-10%-0603, "Capacitor Ceramic X5R 4.7uF 10V 10% 0603", Rating=10V, Tolerance=10%, Type=X5R
C13: library part C-X5R-22uF-10V-20%-0805, "Capacitor Ceramic X5R 22uF 10V 20% 0805", Rating=10V, Tolerance=20%, Type=X5R
C15: library part C-X5R-10uF-10V-20%-0603, "Capacitor Ceramic X5R 10uF 10V 20% 0603", Rating=10V, Tolerance=20%, Type=X5R
C20 C21: library part C_15P_0402_NP0_J_50, Manufacturer=Murata, Part Number=GRM1555C1H150JZ01D
C22 C23 C24 C25 C26 C29 C30 C32 C38 C43 C44: library part C_47N_0402_X7R_K_25, "Chip Multilayer Ceramic Capacitors for General Purpose, 0402, 47000pF, X7R, 15%, 10%, 25V", Case Code (Imperial)=0402, Case Code (Metric)=1005, Dielectric=X7R, Max Operating Temperature=125°C, Min Operating Temperature=-55°C, Package Quantity=1, Tolerance=10%, Voltage=25V, Capacitance=47nF, Case/Package=0402, Depth=0.5mm, Height=0.5mm, Lead Free="Lead Free", Length=1mm, Material=Ceramic, Mount="Surface Mount", Number of Pins=2, Packaging="Tape and Reel", Radiation Hardening=No, REACH SVHC="No SVHC", Termination=SMD/SMT, Thickness=0.022inch, Voltage Rating=25V, Voltage Rating (DC)=25V, Width=0.02inch
C27: library part C_1N8_0402_U2J_J_10, "GRM1557U1A182JA01D", Manufacturer=Murata, Part Number=GRM1557U1A182JA01D
C28 C33 C35 C36: library part C_5P1_0402_NP0_C_50, Manufacturer=Murata, Part Number=GRM1555C1H5R1CZ01D
C31 C41: library part C_10N_0402_X7R_K_25, Manufacturer=Murata, Part Number=GRM155R71E103KA01D
C34: library part C_220N_0402_X5R_K_10, "C0603 0.22 μF X7R 30ppm/°C 10.00% 10 V", Manufacturer=KEMET, Manufacturer Part Number=C0603C224K8RAC, Package=C0603C-CF, Temperature="-55°C to +125°C", Temperature Characteristic=X7R, Temperature Coefficient=30ppm/°C, Temperature Range High=+125°C, Temperature Range Low=-55°C, Tolerance=0.1, Voltage Rating="10 V", Automotive=Yes, Automotive Grade="Grade 1", Capacitance="0.22 μF", Category=Cap, ComponentLink2Description=Datasheet, ComponentLink2URL=https://api.kemet.com/component-edge/download/datasheet/C0603C100J5GACAUTO.pdf, Device Class L1="Passive Components", Device Class L2=Capacitors, Device Class L3="Ceramic Capacitors", Height=0.87mm, Lead Free=Yes, Material=Ceramic, Mouser Description="Multilayer Ceramic Capacitors MLCC - SMD/SMT 50volts 0.22 uF C0G X7R", Octopart=https://octopart.com/c0603c224k8rac-kemet-7455784, RoHS=TRUE
C37: library part C_39P_0402_NP0_J_50, "Chip Capacitor, 39 pF, +/- 5%, 50 V, -55 to 125 degC, 0402 (1005 Metric), RoHS, Tape and Reel", Case Code (Imperial)=0402, Case Code (Metric)=1005, Max Operating Temperature="125 degC", Min Operating Temperature="-55 degC", Package Quantity=10000, PartNumber=GRM1555C1H390JZ01D, Tolerance=5%, Type (Capacitors)=C0G, Voltage Rating="50 V", Capacitance="39 pF", Case\/Package=0402, ComponentLink1Description="Manufacturer URL", ComponentLink1URL=http://www.murata.com/, ComponentLink2Description=Datasheet, ComponentLink2URL=http://psearch.en.murata.com/capacitor/product/GRM1555C1H390JZ01_.pdf, DatasheetVersion=09/2016, Height="0.5 mm", Lead Pitch="2 mm", Length="0.039 inch", Mount="Surface Mount", Mounting Technology="Surface Mount", PackageDescription="2-Pin Surface Mount Device, Body 1 x 0.5 mm", PackageReference=0402, Packaging="Tape and Reel", Pins=2, Radiation Hardening=No, REACH SVHC="No SVHC", RoHSCompliant=true, Voltage Rating (DC)="50 V", Width="0.02 inch"
C39: library part C_2P2_0402_NP0_C_50, Manufacturer=Murata, Part Number=GRM1555C1H2R2CZ01D
C40: library part C_6P2_0402_NP0_C_50, Manufacturer="AVX Interconnect / Elco", Part Number=04025A6R2CAT2A
C42: library part C_100P_0402_NP0_J_50, Manufacturer=Murata, Part Number=GRM1555C1H101JZ01D
FB1: "Chip Ferrite Bead, 0402, 1000Ω @ 100MHz, 1.1Ω, 25%, 250mA", Case Code (Imperial)=0402, Case Code (Metric)=1005, Current Rating=250mA, DC Resistance (DCR)=1.1R, Frequency=100MHz, Max Operating Temperature=125°C, Min Operating Temperature=-55°C, Package Quantity=1, Tolerance=25%, Case/Package=0402, Contact Plating=Tin, Core Material=Ferrite, DC Current=250mA, DC Resistance-Max=1.1R, Depth=0.5mm, Height=0.5mm, Impedance=1kR, Lead Free="Lead Free", Length=1mm, Material=Steel, Max Current Rating=250mA, Max DC Current=250mA, Military Standard=Not, Number of Circuits=1, Number of Lines=1, Number of Pins=2, Packaging="Tape and Reel", Radiation Hardening=No, REACH SVHC="No SVHC", Series=BLM15H, Shielding=Unshielded, Termination=SMD/SMT, Test Frequency=100MHz, Width=0.5mm
IC1: library part IC-Microchip-MIC94073YMT, "High Side Load Switch, TDFN4 1.2 x 1.6", Manufacturer Name=Microchip, Package=TDFN-4, Manufacturer Part No.=MIC94073YMT
J1: library part CMP-17439-000467-1, "CONN HEADER SMD 5POS 1.25MM", Color=Natural, Flammability Rating="UL94 V-0", Max Operating Temperature=85°C, Min Operating Temperature=-25°C, Voltage Rating=50V, Connector Type=Header, Contact Finish - Mating=TIN, Contact Material=Bronze, Contact Plating=Tin, Contact Shape=Rectangular, Contact Type="Outer Shroud Contact", Fastening Type=Ramp, Insulation Color=Natural, Insulation Material=Nylon, Lead Free="Lead Free", Mated Stacking Heights=7.3mm, Mount="Surface Mount", Number of Pins=5, Number of Positions=5, Number of Rows=1, Packaging="Cut Tape", Pitch=0.049inch, Series=GH, Termination=Solder
J2: library part CMP-17439-000616-1, "CONN HEADER SMD 3POS 1.25MM", Color=Natural, Flammability Rating="UL94 V-0", Max Operating Temperature=85°C, Min Operating Temperature=-25°C, Voltage Rating=50V, Connector Type=Header, Contact Finish - Mating=TIN, Contact Material=Bronze, Contact Plating=Tin, Contact Shape=Rectangular, Contact Type="Outer Shroud Contact", Fastening Type=Ramp, Insulation Color=Natural, Insulation Material=Nylon, Lead Free="Lead Free", Mated Stacking Heights=7.3mm, Mount="Surface Mount", Number of Positions=3, Number of Rows=1, Packaging="Cut Tape", Pitch=0.049inch, Series=GH, Termination=Solder
J3: library part CMP-09399-000002-1, "TERM BLOCK HDR 2POS VERT 7.62MM", Current Rating=12A, Manufacturer="Phoenix Contact", Voltage Rating=630V, Automotive=No, Category=Conn, ComponentLink2Description=Datasheet, ComponentLink2URL=https://www.phoenixcontact.com/pxc-oc-itemdetail-pdf-web/eshop?lineItemType=LineItem&UID=1766563, Conn Gender=Male, Conn Orientation=Straight, Contact Material=Tin, Device Class L1=Connectors, Device Class L2="Headers and Wire Housings", Device Class L3=unset, Digikey Description="TERM BLOCK HDR 2POS VERT 7.62MM", Footprint Url=https://www.phoenixcontact.com/online/portal/us/pxc/product_detail_page/!ut/p/z1/3Vffc6IwEP5X7INvjVkCBLyZe8AftfaqtVVb4YUJIdrcCVhAbfvXX1B753hz-tBx5g4mA0l299vsJl9mwR6eYC9mKzljuUxiNldj16P-qDFqtweEanf3ZgO6LbPZvjUetOs-wY_Yw17OAuxqRW8ug5Slb9hdZiIuJhYyVCKLUpPqxTiZDprNb9gdIE1DQNR7AyDzucDulRAhyp_TZDl7rjwLFoq0giqd3nDUeKyQS7MKFYI6yLqkRM1_oD4dXaOjHBwPYWsPf3kcOGXvKnvLJx0NtGtD68GtZcE9uXIIaQ2cEWh4uElEOJ2zeLZkMxXoZiLJZJHl7SgVXMiVSHcyzn8c5ujP1KZJuOQFxEi85lvD3zuh_EVJ-OHrYBd2pi2RMznPurmIunsKJwLSSxZQB8oWEClbQGXjUKdsHLLLxiG7bByyy8ahu9IdubJdCnf0vwtIKSxTid3FK0cJR1KJw43mF4Xz9UPrBnsyiGprHtWgplRrO1B_q-svikifGtgdayKerVWF6R0tIh1tp3CkCB2K2B8P_cGkOR4ez3vrgeKnlRRrPI6TNFJV_HYXeJGJEGwQBliIhcREhkUEYlDnKIC6YQvDmBIw8TWc8mB-0sMJeOus8NZ54fvnTc6VcV74z67-5uhRvzWKf0r5_eXFc7DHkzgvCDwpiF2FtQiqEDGpujtGZVWYyyzfMEr1FzzwlU0seJ6kmb_4dUtUIeSmbTFqocA0ABmUUsQIGEgInQR0aml63caLKLL1oqHx5H0kgve9ZoO-E26b3--bq_32Dxr0kVfvok4zsHtt3ZxF_sEncy4ufgLJYhWE/p0/IZ7_2G101H41M0L770Q2FA22DPAT82=CZ6_TBTEEP261OQ5B0ID5CEL4R1HN2=LA0=EdownloadId!4187324=action!downloadFile==/#Z7_2G1, Height=12.15mm, Lead Free=Yes, Manufacturer Part Number=1766563, Mouser Description="Pluggable Terminal Blocks 2 Pos 7.62mm pitch Through Hole Header", Number of Contacts=2, Number of Rows=1, Octopart=https://octopart.com/1766563-phoenix+contact-859397, Package=1766563, Pitch=7.62mm, RoHS=TRUE
J4: library part CMP-11597-000007-1, "CONN MICROSD CARD PUSH-PUSH SMD", RoHS Compliant=Yes
J5: library part CMP-1502-03220-3, "Conn USB 3.0 Type A RCP 9 POS 1.25mm Solder RA SMD 9 Terminal 1 Port T/R", Color=Blue, Contact Resistance=50mΩ, Current Rating=250mA, Flammability Rating="UL94 V-0", Insulation Resistance=100MΩ, Max Operating Temperature=85°C, Min Operating Temperature=-20°C, Operating Supply Voltage=30V, Connector Type=USB, Contact Material="Gold, Nickel", Contact Plating=Gold, Features=Shielded, Gender=Receptacle, Height=8.01mm, Lead Free="Lead Free", Length=15.1mm, Mount="Horizontal, Surface Mount, Through Hole", Number of Contacts=9, Number of Pins=9, Number of Ports=1, Orientation=Horizontal, Packaging="Tape and Reel", REACH SVHC=Unknown, RoHS=Compliant, Termination=SMD/SMT, USB Standard="USB 3.0", Voltage Rating=30V, Voltage Rating (AC)=30V, Width=16.66mm
J6: library part CMP-17439-000358-1, "CONN HEADER R/A 2POS 3.96MM", Contact Resistance=20mR, Housing Color=White, Max Current Rating=10A, Max Operating Temperature=85°C, Max Voltage Rating (AC)=250V, Min Operating Temperature=-25°C, Contact Material=Brass, Contact Plating=Copper, Housing Material=Polyamide, Lead Free="Lead Free", Length=7.86mm, Number of Positions=2, Number of Rows=1, Orientation="Right Angle", Packaging=Box, Pitch=3.96mm, Termination=Solder
J7: library part SMA-10V21-TGG, "Rf Coax Conn, Sma Jack, 50 Ohm, Pcb Rohs Compliant: Yes", Insulation Resistance=5GΩ, Max Operating Temperature=165°C, Min Operating Temperature=-65°C, Connector Type=SMA, Impedance=50Ω, Insertion Loss (dB)=0.14dB, Insulation Material=PTFE, Orientation=Straight
L1 L4: library part L_27N_0402_J_LQW, "Wire Wound RF Inductor 27nH ±5% 280mA 0.52Ω 0402 (1005)", Case Code (Imperial)=0402, Case Code (Metric)=1005, Current Rating=280mA, DC Resistance (DCR)=520mR, Inductance=27nH, Max Operating Temperature=125°C, Min Operating Temperature=-55°C, Package Quantity=10000, Resistor Type=Wirewound, Self Resonant Frequency=3.5GHz, Test Frequency=100MHz, Tolerance=5%, Case/Package=0402, Core Material=Air, DC Current=280mA, Depth=0.6mm, Height=0.5mm, Lead Free="Lead Free", Length=1mm, Max DC Current=280mA, Military Standard=Not, Mount="Surface Mount", Packaging="Tape and Reel", Q Factor=25, Radiation Hardening=No, Shielding=Unshielded, Termination=SMD/SMT, Weight=2.8E-05oz, Width=0.02inch
L2 L5: library part L_56N_0402_J_LQW, "Wire Wound RF Inductor 56nH ±5% 200mA 1.17Ω 0402 (1005)", Case Code (Imperial)=0402, Case Code (Metric)=1005, Current Rating=200mA, DC Resistance (DCR)=1.17R, Inductance=56nH, Max Operating Temperature=125°C, Min Operating Temperature=-55°C, Package Quantity=10000, Resistor Type=Wirewound, Self Resonant Frequency=2.8GHz, Test Frequency=100MHz, Tolerance=5%, =Value="56 nH", Case/Package=0402, Core Material=Air, DC Current=200mA, Depth=0.6mm, Height=0.5mm, Lead Free="Lead Free", Length=1mm, Max DC Current=200mA, Military Standard=Not, Mount="Surface Mount", Packaging="Tape and Reel", Q Factor=25, Radiation Hardening=No, Shielding=Unshielded, Termination=SMD/SMT, Weight=2.8E-05oz, Width=0.5mm
L3 L6: library part L_15N_0402_J_LQW, "Wire Wound RF Inductor 15nH ±5% 460mA 0.16Ω 0402 (1005)", Case Code (Imperial)=0402, Case Code (Metric)=1005, Current Rating=460mA, DC Resistance (DCR)=160mR, Max Operating Temperature=125°C, Min Operating Temperature=-55°C, Package Quantity=10000, Resistor Type=Wirewound, Self Resonant Frequency=5GHz, Test Frequency=100MHz, Tolerance=5%, Case/Package=0402, Core Material=Air, DC Current=460mA, Depth=0.7mm, Height=0.5mm, Inductance=15nH, Lead Free="Lead Free", Length=1mm, Max DC Current=460mA, Military Standard=Not, Mount="Surface Mount", Packaging="Tape and Reel", Q Factor=30, Radiation Hardening=No, Shielding=Unshielded, Termination=SMD/SMT, Weight=2.8E-05oz, Width=0.02inch
L7: library part L_43N_0402_J_LQW, "Wire Wound RF Inductor 43nH ±5% 250mA 0.7Ω 0402 (1005)", Case Code (Imperial)=0402, Case Code (Metric)=1005, Current=145mA, Current Rating=250mA, DC Resistance (DCR)=700mR, Inductance=43nH, Inductance Tolerance=5%, Max Operating Temperature=125°C, Min Operating Temperature=-55°C, Package Quantity=1, Self Resonant Frequency=3GHz, Test Frequency=100MHz, Case/Package=0402, Core Material=Air, DC Current=250mA, Depth=0.6mm, Height=0.5mm, Length=1mm, Max DC Current=250mA, Military Standard=Not, Mount="Surface Mount", Packaging="Tape and Reel", Q Factor=25, Radiation Hardening=No, REACH SVHC="No SVHC", Shielding=Unshielded, Termination=SMD/SMT, Tolerance=5%, Weight=2.8E-05oz, Width=0.02inch
R1 R2 R3 R4 R5 R6 R7 R8 R9 R10 R11 R12 R13: library part CMP-2100-03664-2, "RES 10K OHM 1% 1/10W 0603", Case Code (Imperial)=0603, Case Code (Metric)=1608, Max Operating Temperature=155°C, Max Power Dissipation=100mW, Min Operating Temperature=-55°C, Resistance=10kR, Resistance Tolerance=1%, Resistor Type="Thick Film", Temperature Coefficient=100ppm/°C, Voltage Rating=75V, Voltage Rating (DC)=50V, Case/Package=0603, Construction=Rectangular, Depth=0.8mm, Features="Moisture Resistant", Height=0.45mm, Lead Free="Lead Free", Lead Pitch=0.3mm, Length=1.6mm, Military Standard=Not, Number of Pins=2, Number of Terminations=2, Packaging="Tape and Reel", Power Rating=100mW, RoHS Compliant=Yes, Series=RC, Size Code=0603, Termination=SMD/SMT, Tolerance=1%, Weight=7.1E-05oz, Width=0.8mm
R14: library part R_0_0402, "RES 0 OHM JUMPER 0402", Case Code (Imperial)=0402, Case Code (Metric)=1005, Max Operating Temperature=155°C, Min Operating Temperature=-55°C, Package Quantity=10000, Power Rating=1W, Resistor Type="Thick Film", Temperature Coefficient=200ppm/°C, Tolerance=5%, Case/Package=0402, Construction=Rectangular, Depth=0.5mm, Height=0.35mm, Lead Free="Lead Free", Length=1mm, Military Standard=Not, Packaging="Tape and Reel", Resistance=0mR, RoHS Compliant=Yes, Series=RK73Z, Termination=SMD/SMT, Width=0.5mm
R15: library part R_18_0402_J, "18Ω ±5% 0.063W 0402 Thick Film Chip Resistor AEC-Q200 compliant", Case Code (Imperial)=0402, Case Code (Metric)=1005, Max Operating Temperature=155°C, Max Power Dissipation=63mW, Min Operating Temperature=-55°C, Resistor Type="Thick Film", Temperature Coefficient=100ppm/°C, Tolerance=5%, Case/Package=0402, Contact Plating=Tin, Features="Automotive AEC-Q200", Height=0.016inch, Lead Free="Lead Free", Length=0.039inch, Mount="Surface Mount", Number of Terminations=2, Packaging="Tape and Reel", Resistance=18R, RoHS Compliant=Yes, Series=RMCF, Width=0.02inch
R16: library part R_56K_0402_F, "R_56K_0402_F", Manufacturer="KOA Speer", Part Number=RK73H1ETTP5602F
SW1 SW2: library part SW-WMF-TD-03XB, "Push Button", Manufacturer Name="Wealth Metal", Manufacturer Part No.=TD-03XB-V, Rating=50mA
U1 U3: "Four-channel fixed multidirectional level shifter 14-TSSOP -40 to 125", Manufacturer_Name="Texas Instruments", Copyright="Copyright (C) 2026 Ultra Librarian. All rights reserved.", Manufacturer_Part_Number=TXU0304PWR, RefDes=RefDes, Type=Type
U2: library part CMP-0314-00419-3, "IC TRNSLTR BIDIRECTIONAL 8VSSOP", Case/Package=VSSOP, Max Operating Temperature=85°C, Max Supply Voltage=5V, Min Operating Temperature=-40°C, Min Supply Voltage=0uV, Output Current=64mA, Package Quantity=1, Contact Plating=Gold, Height=0.85mm, Lead Free="Lead Free", Length=2.3mm, Logic Function=Translator, Number of Bits=2, Number of Channels=2, Number of Inputs=2, Number of Outputs=2, Number of Pins=8, Output Type=I2C, Packaging="Tape and Reel", Propagation Delay=1.4ns, Radiation Hardening=No, REACH SVHC="No SVHC", Termination=SMD/SMT, Turn-On Delay Time=1.2ns, Weight=0.000339oz, Width=2mm
U4: "Two channel fixed-direction level shifter with channels in opposite direction 8-VSSOP -40 to 125", Manufacturer_Name="Texas Instruments", Copyright="Copyright (C) 2026 Ultra Librarian. All rights reserved.", Manufacturer_Part_Number=TXU0202DCUR, RefDes=RefDes, Type=Type
U5: library part CMP-04985-000017-1, "TVS DIODE 5.5V 14V 14USON", Breakdown Voltage=6V, Clamping Voltage=14V, Leakage Current=10nA, Max Operating Temperature=125°C, Max Power Dissipation=40W, Min Operating Temperature=-40°C, Package Quantity=3000, Peak Pulse Current=2.5A, Power Line Protection=Yes, Reverse Standoff Voltage=5.5V, Depth=1.45mm, Direction=Unidirectional, Interface=LVDS, Lead Free="Lead Free", Length=3.6mm, Min Breakdown Voltage=6V, Mount="Surface Mount", Number of Bidirectional Channels=6, Number of Channels=6, Number of Pins=14, Packaging="Tape and Reel", Peak Pulse Power=40W, Polarity=Bidirectional, Radiation Hardening=No, RoHS Compliant=Yes, Termination=SMD/SMT, Working Voltage=5.5V
U6: library part CMP-0337-00284-2, "Adjustable, Active High, Constant-Current, Current-Limited Power-Distribution Switch, 0.075 to 1.7 A Current Limit, -40 to 85 degC, 6-pin SOT-23 (DBV), Green (RoHS & no Sb/Br)", Continuous Current(Max)(A)=1.5, Current Limit Accuracy @ 1A="+/-7.5% (925mA min / 1075mA max)", Current Limit Topology=Constant-Current, Current Limit(A)="0.075 to 1.7", Manufacturer="Texas Instruments", PartNumber=TPS2553DBVR, Rating=Catalog, Code_JEDEC=MO-178-AB*, ComponentLink1Description=Datasheet, ComponentLink1URL=http://www.ti.com/general/docs/lit/getliterature.tsp?genericPartNumber=TPS2553&fileType=pdf, DatasheetVersion=SLVS841E, Eco-Plan="Green (RoHS & no Sb/Br)", Enable="Active High", Mounting Technology="Surface Mount", Number of Switches=1, PackageDescription="6-Pin Plastic Small-Outline Package, 2.9 x 1.6 mm Body, 0.95 mm Pitch, 2.8 mm Lead Span", PackageReference=DBV0006A, PackageVersion="revK, Mar-2006", rDS(on) per FET(Typ)(mOhms)="100/DRV, 85/DBV", Vin(Max)(V)=6.5, Vin(Min)(V)=2.5
U7: library part CMP-04924-000017-1, "IC RF TXRX+MCU ISM<1GHZ 32VFQFN", Case/Package=VQFN, Current - Receiving=23mA, Current - Transmitting=54mA, Frequency=960MHz, Max Frequency=480MHz, Max Operating Temperature=85°C, Max Supply Voltage=3.6V, Min Frequency=164MHz, Min Operating Temperature=-40°C, Min Supply Voltage=2V, Output Power (dBm)=16dBm, Package Quantity=1, Data Rate=200Kbps, Density=0B, Interface=SPI, Lead Free="Lead Free", Mount="Surface Mount", Number of Pins=32, Number of Receivers=1, Number of Transmitters=1, Packaging="Tape and Reel", Radiation Hardening=No, REACH SVHC="No SVHC", RoHS Compliant=Yes, Sensitivity=-127dBm, Series=CC1120
X1: library part CON-TE-2309409-2, "DDR4 SODIMM Socket, 260 pins, 5.2mm(H), 0.5mm Pitch", Manufacturer Name="TE Connectivity", Package=DDR4-SODIMM-260, Temperature Range="-40C to +125C", Manufacturer Part No.=2309409-2
Y1: "Crystal 32MHz ±10ppm 6pF SMD-4 2.5mm x 2mm"

## Via types
v1: diameter 15.75, hole 10, Top Layer to Bottom Layer, 154 vias
v2: diameter 19.68, hole 7.87, Top Layer to Bottom Layer, 5 vias
v3: diameter 50, hole 28, Top Layer to Bottom Layer, 1 vias

## Nets (pads, with @x,y where several pads share a name; then routed paths per layer and width w, separated by ;. In a path a pad name is that pad's centre, name@x,y a point inside that pad or via, vN(x,y) a via of type N, cw(c..) or ccw(c..) an arc to the next point about the centre after c; other vN are vias at no path point)
3V3: C2.2 C5.2 C6.2 C14.2 FB1.1 IC1.3 J6.2 R1.2 R2.2 R4.1 R8.2 U1.14 U3.1 U4.7 | length 5131.3
  Top Layer w5.91: C2.2@1349.29,355 1415.67,355 1420.67,350 R2.2@1463.84,350 1463.84,379 ; C14.2@1359.29,650 1417,650 1426.42,659.42 R8.2@1485,659.42 1485,616.71 1484.29,616 C5.2@1484.29,575 1484.29,549.87 1454.42,520 R4.1@1454.42,495 1454.42,426.42 1463.84,417 1463.84,379 ; v1(1573,429) 1513.84,429 1463.84,379 ; C6.2@1655,499.29 1655,511 v1(1668,524) ; IC1.3@1909.84,523.54 IC1.3@1909.84,529 ; v1(1922,556) 1909.84,543.84 IC1.3@1909.84,529 ; R1.2@1953.84,615 1953.84,698.61 2245,989.77 ; U4.7@2288.11,1760.16 2312,1760.16 2443,1629.16 2443,1445.23 2465,1423.23 ; U3.1@2506.14,1423.23 2465,1423.23 ; J6.2@3132.95,719.88 3345,931.93 FB1.1@3345,1050.19 ; IC1.3@1909.84,529 2050,529 2061,540 2193,540 2245,592 2245,989.77 ; 2245,989.77 2245,1046 2313.23,1114.23 U1.14@2313.23,1211.14 2313.23,1271.46 2465,1423.23
  GND w5.91: v1(1573,429) v1(1668,524) ; v1(1922,556) 2096,556 2151,611 3024.07,611 J6.2@3132.95,719.88
  Bottom Layer w5.91: v1(1668,524) 1922,524 v1(1922,556)